# Altium PCB 2026.08.07.HMS.PD.BHHH.PcbDoc (part 2 of 2)
Units mm, origin at the board's own origin, x right, y up, seen from the top; angles counter-clockwise.
Board outline 110 x 110 mm, 2 copper layers (Top Layer, Bottom Layer); 168 components, 117 nets, 606 pads, 1355 vias.
Unrouted connection lines stored in the file: 4.
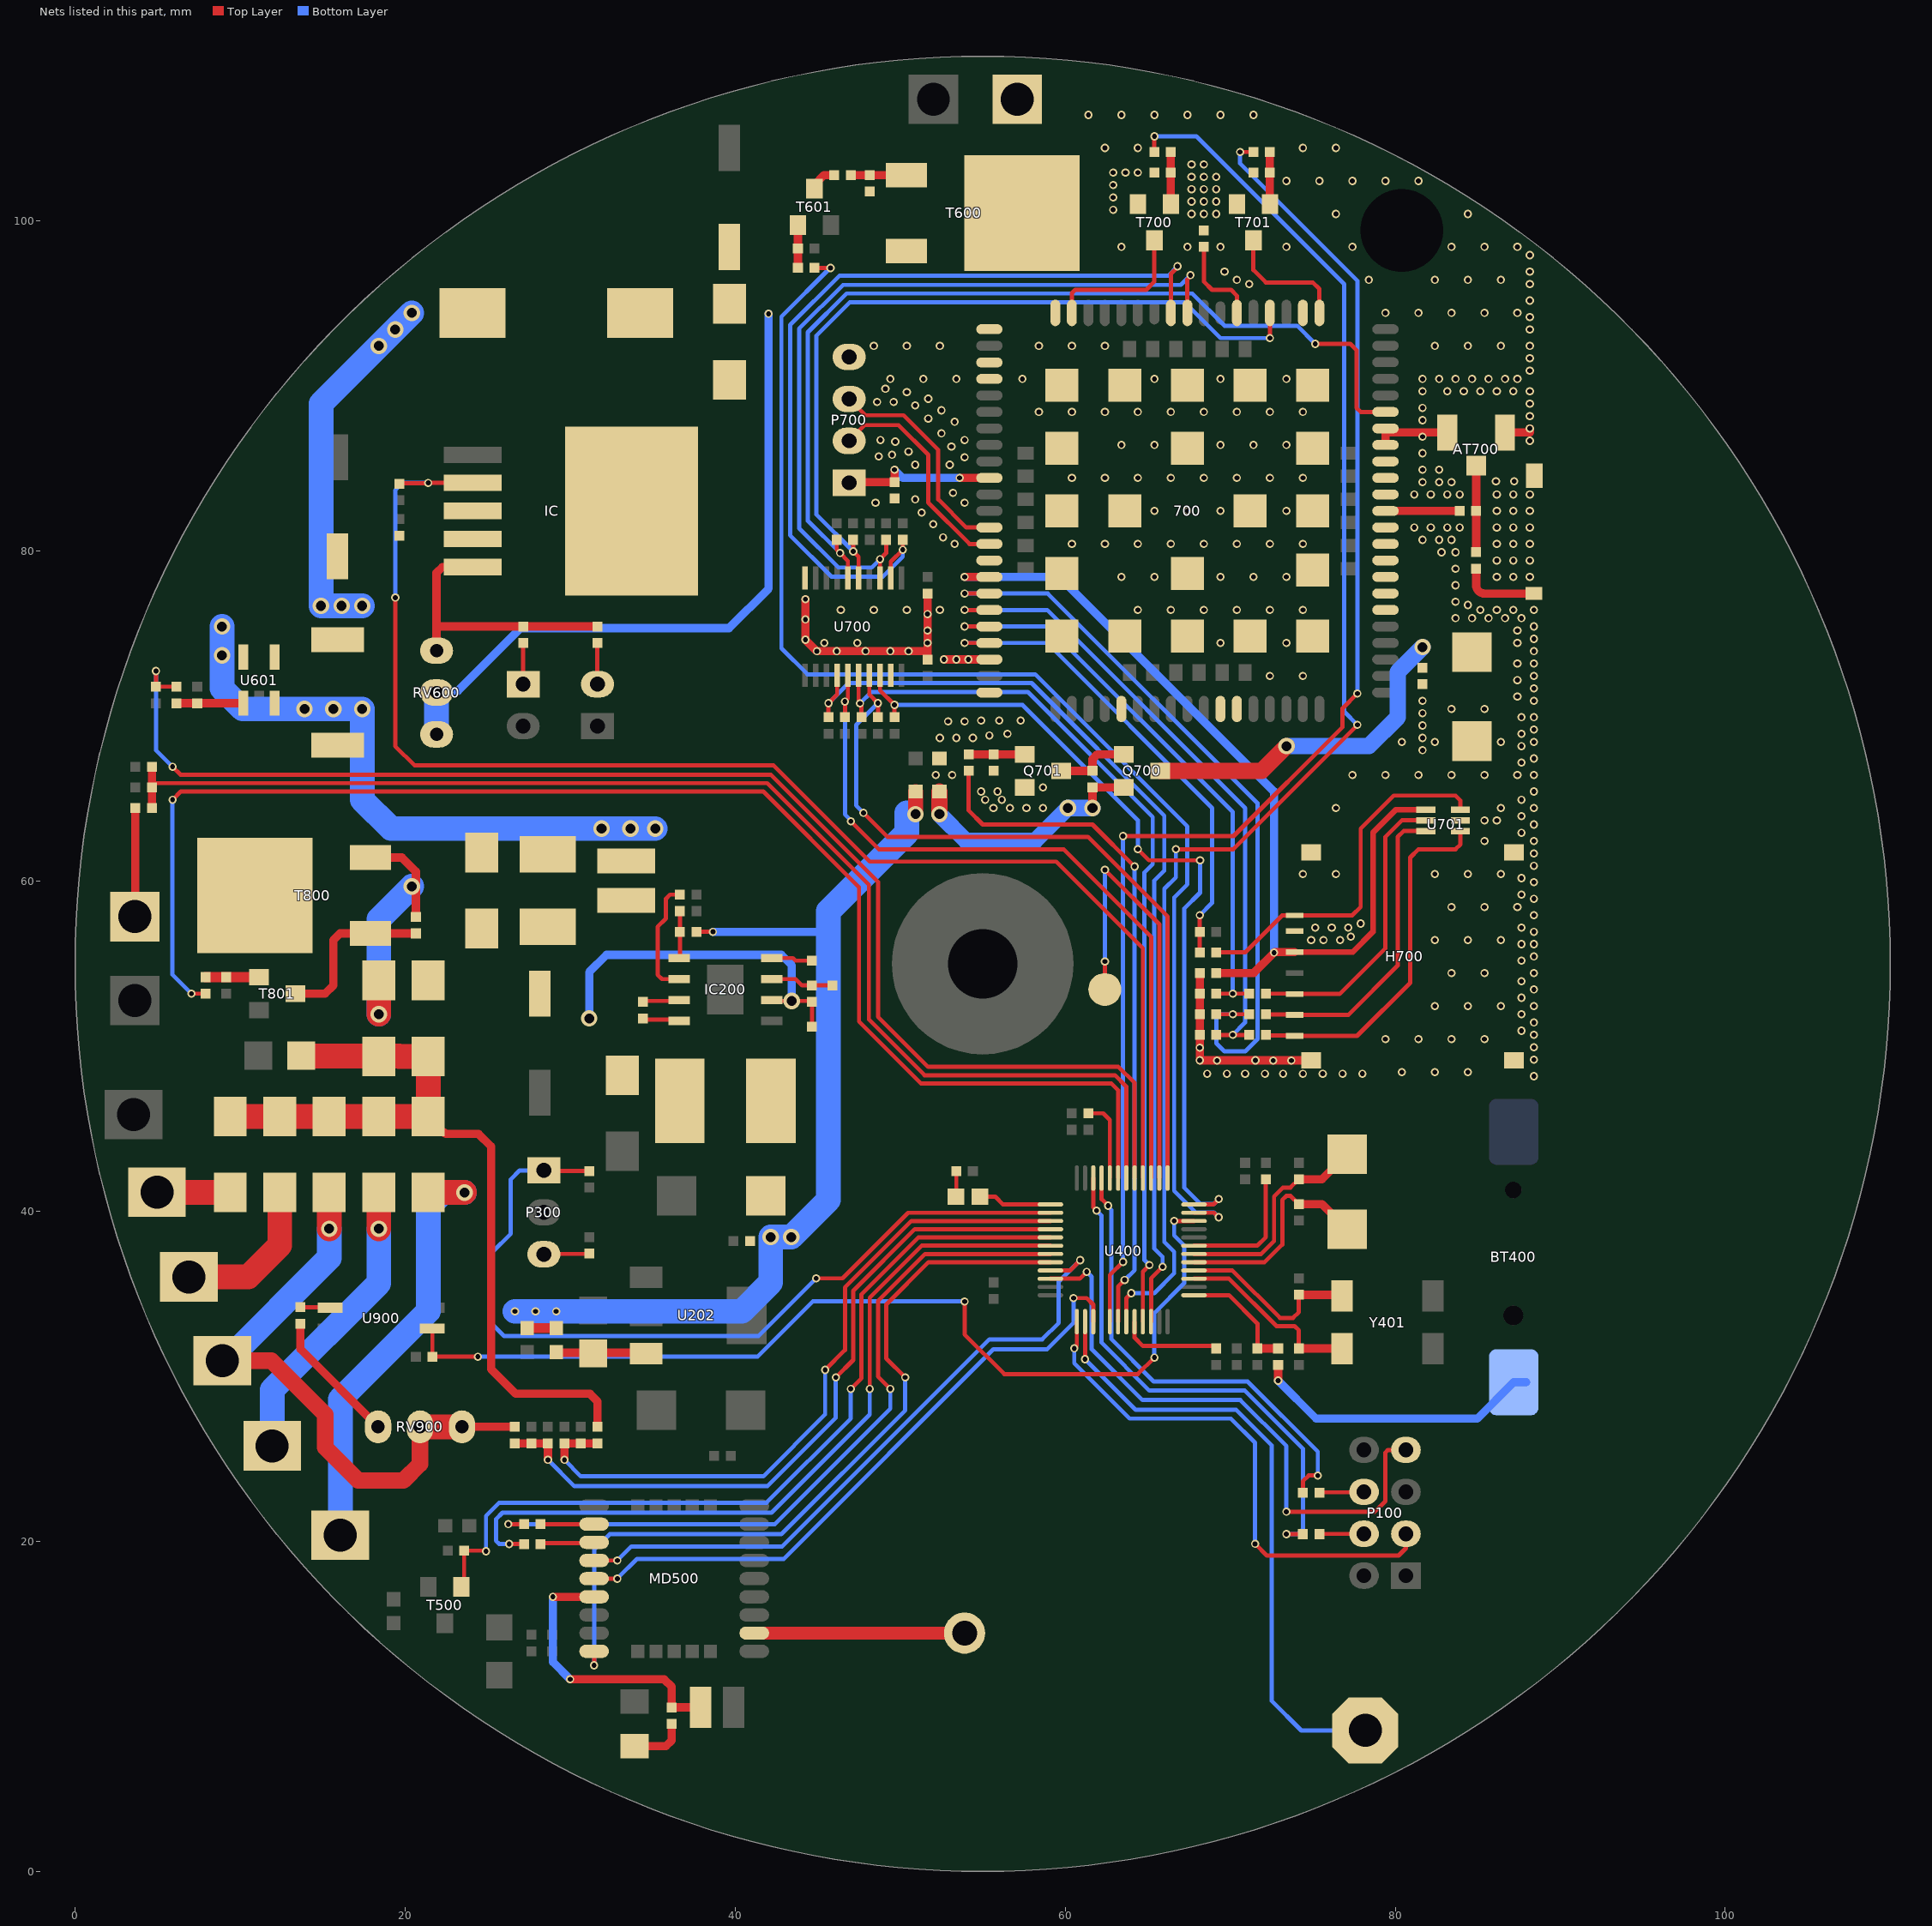
[diagram p2: the nets of this part, all layers, seen from the top]

## Via types
v1: diameter 0.5, hole 0.3, Top Layer to Bottom Layer, tented both sides, 1270 vias
v2: diameter 0.6, hole 0.3, Top Layer to Bottom Layer, tented both sides, 48 vias
v3: diameter 1, hole 0.6, Top Layer to Bottom Layer, tented both sides, 37 vias

## Nets (pads, with @x,y where several pads share a name; then routed paths per layer and width w, separated by ;. In a path a pad name is that pad's centre, name@x,y a point inside that pad or via, vN(x,y) a via of type N, cw(c..) or ccw(c..) an arc to the next point about the centre after c; other vN are vias at no path point) (continued)
GSM.GND: 700.2 700.17 700.18 700.29 700.39 700.45 700.46 700.54 700.58 700.59 700.61 700.62 700.63 700.64 700.65 700.69 700.70 700.71 700.72 700.73 700.74 700.75 700.76 700.77 700.78 700.79 700.80 700.81 700.82 700.83 700.84 700.85 700.86 700.87 700.88 700.89 700.91 700.92 700.94 AT700.2 AT701.2 C701.2 C703.1 C704.1 C705.1 C706.1 C707.1 C708.1 C709.1 C730.2 H700.5 L701.2 P700.4 Q701.2 R700.1 R707.1 R709.2 R711.2 T700.2 T701.2 U700.10 U700.19 U701.2 | length 35.2
  Top Layer w0.5: v1(44.254,77.093) v1(44.254,74.643) v1(44.954,73.943) v1(49.404,73.943) 51.604,73.943 51.654,73.993 ; C705.1@51.654,73.443 51.654,73.993 ; C704.1@51.654,77.443 51.654,73.993 ; v1(52.654,73.443) 700.92@55.404,73.443 ; C706.1@68.154,54.443 C707.1@68.154,53.193 C709.1@68.154,51.943 C708.1@68.154,50.693 v1(68.154,49.153) H700.5@74.904,49.153 ; 700.64@79.404,86.443 79.404,87.193 AT700.2@83.154,87.193 ; AT700.2@86.654,87.193 88.154,87.193 v1(88.154,87.443)
  other v1: 88.404,48.193 68.604,48.343 69.804,48.343 70.904,48.343 72.104,48.343 73.204,48.343 74.404,48.343 75.604,48.343 76.804,48.343 78.004,48.343 80.404,48.443 82.404,48.443 84.404,48.443 69.204,49.143 72.604,49.143 73.704,49.143 71.529,49.153 88.404,49.193 68.154,49.923 88.404,49.943 79.404,50.443 81.404,50.443 83.404,50.443 85.404,50.443 88.404,50.693 87.654,50.943 88.404,51.443 87.654,51.943 82.404,52.443 84.404,52.443 86.404,52.443 88.404,52.443 87.654,52.943 88.404,53.443 87.654,53.943 83.404,54.443 85.404,54.443 88.404,54.443 87.654,55.193 88.404,55.443 87.654,56.193 88.404,56.193 74.904,56.443 75.654,56.443 76.654,56.443 82.404,56.443 84.404,56.443 86.404,56.443 77.304,56.643 88.404,56.943 75.154,57.193 76.154,57.193 77.154,57.193 87.654,57.193 77.904,57.443 88.404,57.943 83.404,58.443 85.404,58.443 87.404,58.443 88.404,58.943 87.654,59.193 88.404,59.943 87.654,60.193 74.404,60.443 76.404,60.443 82.404,60.443 84.404,60.443 86.404,60.443 88.404,60.943 88.404,61.693 85.404,62.443 88.404,62.443 87.654,62.943 88.404,63.443 85.404,63.693 86.154,63.693 87.654,63.943 55.654,64.443 56.654,64.443 57.654,64.443 58.654,64.443 76.404,64.443 86.404,64.443 88.404,64.443 55.154,64.943 56.154,64.943 87.654,64.943 54.904,65.443 55.904,65.443 88.404,65.443 58.654,65.693 52.154,66.443 53.154,66.443 77.404,66.443 79.404,66.443 81.404,66.443 83.404,66.443 85.404,66.443 87.404,66.443 88.404,66.443 87.654,67.193 88.404,67.443 81.654,67.943 87.654,68.193 80.404,68.443 82.404,68.443 86.404,68.443 88.404,68.443 52.404,68.693 53.404,68.693 54.404,68.693 81.654,68.693 55.404,68.843 56.504,68.943 87.654,68.943 88.404,69.193 81.654,69.443 52.904,69.693 53.904,69.693 54.904,69.743 56.004,69.743 57.304,69.743 87.654,69.943 88.404,69.943 81.654,70.193 83.404,70.443 85.404,70.443 81.654,70.943 88.404,70.943 87.404,71.193 88.404,71.693 87.404,72.193 72.404,72.443 74.404,72.443 88.404,72.443 87.404,73.193 88.404,73.193 53.404,73.443 54.129,73.443 46.154,73.943 47.904,73.943 50.504,73.943 88.404,73.943 45.404,74.443 47.404,74.443 51.654,74.443 69.404,74.443 73.404,74.443 87.404,74.443 88.404,74.693 51.654,75.193 87.404,75.193 88.404,75.443 44.254,75.868 83.654,75.943 84.654,75.943 85.654,75.943 86.654,75.943 87.654,75.943 51.654,76.193 46.404,76.443 48.404,76.443 50.404,76.443 52.404,76.443 64.404,76.443 66.404,76.443 68.404,76.443 70.404,76.443 72.404,76.443 74.404,76.443 85.154,76.443 86.154,76.443 87.154,76.443 88.404,76.443 84.404,76.743 83.654,76.943 83.654,77.943 63.404,78.443 65.404,78.443 69.404,78.443 71.404,78.443 73.404,78.443 86.154,78.443 87.154,78.443 88.154,78.443 83.654,78.943 86.154,79.443 87.154,79.443 88.154,79.443 82.804,79.943 83.654,79.943 53.304,80.443 60.404,80.443 62.404,80.443 64.404,80.443 66.404,80.443 68.404,80.443 70.404,80.443 72.404,80.443 74.404,80.443 86.154,80.443 87.154,80.443 88.154,80.443 81.654,80.693 82.654,80.693 83.404,80.693 52.604,80.843 81.154,81.443 82.154,81.443 83.154,81.443 83.904,81.443 86.154,81.443 87.154,81.443 88.154,81.443 52.004,81.643 51.304,82.343 65.404,82.443 67.404,82.443 69.404,82.443 73.404,82.443 86.154,82.443 87.154,82.443 88.154,82.443 48.504,82.943 53.904,82.943 50.904,83.143 81.154,83.443 82.154,83.443 83.154,83.443 83.904,83.443 86.154,83.443 87.154,83.443 88.154,83.443 53.204,83.543 81.654,84.193 82.654,84.193 83.404,84.193 86.104,84.243 87.204,84.243 60.404,84.443 62.404,84.443 64.404,84.443 66.404,84.443 68.404,84.443 70.404,84.443 72.404,84.443 74.404,84.443 81.654,84.943 82.654,84.943 50.904,85.243 53.004,85.243 53.904,85.693 48.704,85.743 49.504,85.843 81.654,85.943 50.504,86.043 53.104,86.343 63.404,86.443 65.404,86.443 69.404,86.443 71.404,86.443 73.404,86.443 49.704,86.643 88.154,86.693 48.804,86.743 53.904,86.743 81.654,86.943 52.504,87.143 53.304,87.843 81.654,87.943 51.704,88.043 88.154,88.193 58.404,88.443 60.404,88.443 62.404,88.443 64.404,88.443 66.404,88.443 68.404,88.443 70.404,88.443 72.404,88.443 74.404,88.443 52.504,88.543 81.654,88.693 50.904,88.843 88.154,88.943 48.604,89.043 49.604,89.043 51.704,89.243 50.404,89.643 81.654,89.693 83.154,89.693 84.154,89.693 85.154,89.693 86.154,89.693 87.154,89.693 88.154,89.693 49.104,89.843 49.404,90.443 51.404,90.443 53.404,90.443 57.404,90.443 65.404,90.443 69.404,90.443 73.404,90.443 81.654,90.443 82.654,90.443 83.654,90.443 84.654,90.443 85.654,90.443 86.654,90.443 87.404,90.443 88.154,90.943 88.154,91.693 48.404,92.443 50.404,92.443 52.404,92.443 58.404,92.443 60.404,92.443 62.404,92.443 82.404,92.443 84.404,92.443 86.404,92.443 88.154,92.443 88.154,93.443 88.154,94.193 79.404,94.443 81.404,94.443 83.404,94.443 85.404,94.443 87.404,94.443 88.154,95.193 71.154,96.193 88.154,96.193 70.404,96.443 78.404,96.443 82.404,96.443 84.404,96.443 86.404,96.443 69.654,96.943 88.154,96.943 88.154,97.943 63.404,98.443 67.404,98.443 69.404,98.443 73.404,98.443 77.404,98.443 83.404,98.443 85.404,98.443 87.404,98.443 67.654,100.443 68.404,100.443 69.154,100.443 76.404,100.443 84.404,100.443 62.904,100.693 67.654,101.193 68.404,101.193 69.154,101.193 62.904,101.443 67.654,101.943 68.404,101.943 69.154,101.943 62.904,102.193 73.404,102.443 75.404,102.443 77.404,102.443 79.404,102.443 81.404,102.443 67.654,102.693 68.404,102.693 69.154,102.693 62.904,102.943 63.654,102.943 64.404,102.943 67.654,103.443 68.404,103.443 62.404,104.443 64.404,104.443 74.404,104.443 76.404,104.443 61.404,106.443 63.404,106.443 65.404,106.443 67.404,106.443 69.404,106.443 71.404,106.443
GSM.PWR: L700.2 Q700.2 R705.2 | length 15.3
  Top Layer w0.5: v3(61.654,64.443) 61.654,65.693 Q700.2@63.554,65.693
  Top Layer w1: v3(52.377,64.07) L700.2@52.377,65.443
  Bottom Layer w1: v3(52.377,64.07) 54.004,62.443 58.154,62.443 v3(60.154,64.443) v3(61.654,64.443)
GSM.PWRKEY: 700.1 T701.3 | length 7.7
  Top Layer w0.254: T701.3@71.404,98.843 71.404,97.043 72.154,96.293 75.004,96.293 75.404,95.893 700.1@75.404,94.443
GSM.RESET: 700.16 T700.3 | length 9
  Top Layer w0.254: 700.16@60.404,94.443 60.404,95.643 60.604,95.843 64.904,95.843 65.404,96.343 T700.3@65.404,98.843
GSM.RI: 700.4 R717.1 U700.5 | length 47.2
  Top Layer w0.254: R717.1@47.154,80.693 v1(47.154,79.993) 47.479,79.668 U700.5@47.479,78.393 ; v1(72.404,92.918) 700.4@72.404,94.443
  Bottom Layer w0.254: v1(47.154,79.993) 44.929,82.218 44.929,93.071 46.951,95.093 67.232,95.093 69.407,92.918 v1(72.404,92.918)
GSM.Status: 700.66 R718.1 U700.6 | length 57.8
  Top Layer w0.254: R718.1@46.154,80.693 46.154,80.093 v1(46.354,79.893) 46.829,79.418 U700.6@46.829,78.393 ; v1(75.154,92.568) 77.279,92.568 77.654,92.193 77.654,88.693 77.904,88.443 700.66@79.404,88.443
  Bottom Layer w0.254: v1(46.354,79.893) 44.404,81.843 44.404,93.268 46.754,95.618 67.704,95.618 69.654,93.668 74.054,93.668 v1(75.154,92.568)
GSM.VBAT: 700.55 700.56 700.57 C703.2 C730.1 Q700.3 | length 20.6
  Top Layer w1: Q700.3@65.754,66.693 71.904,66.693 v3(73.404,68.193)
  Bottom Layer w1: v3(73.404,68.193) 78.404,68.193 80.154,69.943 80.154,72.693 v3(81.654,74.193)
LED: D400.2 U400.25 | length 4.5
  Top Layer w0.254: D400.2@54.829,40.893 55.754,40.893 56.229,40.418 U400.25@59.104,40.418
LED_PWR: C600.1 D600.2 R602.2 RV600.2 RV600.3 T600.3 | length 41.9
  Bottom Layer w0.5: RV600.2@21.904,71.443 22,71.539 23.2,71.539 27.004,75.343 39.629,75.343 42.029,77.743 v1(42.029,94.393)
  Bottom Layer w1.5: RV600.3@21.904,68.903 RV600.2@21.904,71.443
LED_VCC: C601.2 C602.1 IC.4 L601.1 R603.2 U601.4 | length 22.5
  Bottom Layer w1.5: v3(17.404,76.693) v3(16.154,76.693) v3(14.904,76.693) 14.904,88.943 v3(20.404,94.443)
  other v3: 18.404,92.443 19.404,93.443
Net700_60: 700.60 C700.2 | length 4.5
  Top Layer w0.5: 700.60@79.404,82.443 C700.2@83.904,82.443
Net`_2: `.2 P300.3 | length 2.8
  Top Layer w0.254: P300.3@28.404,37.403 28.424,37.423 31.134,37.423 `.2@31.154,37.443
NetAT500_1: AT500.1 MD500.11 | length 12.8
  Top Layer w0.8: MD500.11@41.154,14.443 AT500.1@53.904,14.443
NetAT700_1: AT700.1 C700.1 R777.2 | length 8
  Top Layer w0.35: C700.1@84.904,82.443 AT700.1@84.904,85.193
  Top Layer w0.5: R777.2@84.904,79.943 C700.1@84.904,82.443 AT700.1@84.904,85.193
NetAT701_1: AT701.1 R777.1 | length 4.8
  Top Layer w0.5: R777.1@84.904,78.943 84.904,77.943 ccw(c85.404,77.943) 85.404,77.443 AT701.1@88.404,77.443
NetC200_1: C200.1 D200.2 IC200.8 L201.1 | length 2.3
  Top Layer w0.254: C200.1@34.404,51.693 34.481,51.616 36.523,51.616 IC200.8@36.6,51.538
NetC200_2: C200.2 IC200.7 | length 2.2
  Top Layer w0.254: C200.2@34.404,52.693 34.461,52.751 36.543,52.751 IC200.7@36.6,52.808
NetC201_2: C201.2 L202.2 U202.3 | length 5.5
  Top Layer w0.5: L202.2@29.154,31.47 29.193,31.432 34.567,31.432 U202.3@34.606,31.393
NetC204_1: C204.1 C205.2 IC200.2 L200.2 R200.2 | length 21.9
  Top Layer w0.254: IC200.2@42.207,52.808 42.265,52.75 v3(43.431,52.75) 44.596,52.75 R200.2@44.654,52.693 C205.2@44.654,51.193
  Bottom Layer w0.5: v3(31.154,51.693) 31.154,54.493 32.204,55.543 42.804,55.543 43.431,54.916 v3(43.431,52.75)
NetC503_1: C503.1 MD500.6 R502.1 | length 17.3
  Top Layer w0.5: v1(28.954,16.643) MD500.6@31.454,16.643 ; v1(30.004,11.643) 35.704,11.643 36.154,11.193 R502.1@36.154,9.943 C503.1@37.904,9.943
  Bottom Layer w0.5: v1(28.954,16.643) 28.954,12.693 v1(30.004,11.643)
NetC603_2: C603.2 R606.2 U400.17 | length 85.2
  Top Layer w0.254: v1(4.904,72.743) C603.2@4.904,71.793 R606.2@6.154,71.793 ; v1(5.904,66.943) 6.388,66.459 6.804,66.459 41.888,66.459 42.163,66.459 48.654,59.968 48.654,51.793 51.688,48.759 63.225,48.759 64.204,47.78 U400.17@64.204,42.018
  Bottom Layer w0.254: v1(4.904,72.743) 4.904,67.943 v1(5.904,66.943)
NetC801_2: C801.2 R800.1 R803.2 U400.27 | length 43.1
  Top Layer w0.254: v1(45.456,30.395) 46.654,31.593 46.654,35.386 50.686,39.418 U400.27@59.104,39.418
  Top Layer w0.5: v1(29.654,24.943) R803.2@29.654,25.943 R800.1@31.654,25.943
  Bottom Layer w0.254: v1(29.654,24.943) 30.654,23.943 41.704,23.943 45.456,27.695 v1(45.456,30.395)
NetC803_2: C803.2 R802.1 R804.2 U400.18 | length 79.5
  Top Layer w0.254: R804.2@4.654,65.951 41.396,65.951 41.946,65.951 48.104,59.793 48.104,51.625 51.478,48.251 63.014,48.251 63.704,47.561 U400.18@63.704,42.018
  Top Layer w0.5: R802.1@4.654,64.443 4.654,64.943 4.654,65.951 C803.2@4.654,66.943
NetC900_2: C900.2 R900.1 R901.2 U400.28 | length 44.5
  Top Layer w0.254: v1(46.1,29.939) 47.154,30.993 47.154,35.179 50.893,38.918 U400.28@59.104,38.918
  Top Layer w0.5: R900.1@26.654,25.943 R901.2@28.654,25.943 v1(28.654,24.943)
  Bottom Layer w0.254: v1(28.654,24.943) 30.254,23.343 41.953,23.343 46.1,27.491 v1(46.1,29.939)
NetD400_1: D400.1 R404.2 | length 1.6
  Top Layer w0.254: D400.1@53.379,40.893 53.404,40.918 R404.2@53.404,42.443
NetD500_2: D500.2 R502.2 | length 3.4
  Top Layer w0.5: D500.2@33.904,7.593 35.804,7.593 36.154,7.943 R502.2@36.154,8.943
NetD600_1: D600.1 IC.3 IC.6 L601.2
NetD800_2: D800.2 R801.2 T800.3 | length 16.5
  Top Layer w0.5: T800.3@17.904,61.443 19.804,61.443 20.654,60.593 R801.2@20.654,57.843
  Top Layer w1.5: v3(18.404,51.943) D800.2@18.404,53.993
  Bottom Layer w1.5: v3(18.404,51.943) 18.404,57.693 v3(20.404,59.693)
NetD900_1: D900.1 T900.1 | length 4.4
  Top Layer w1.5: T900.1@4.962,41.157 4.969,41.15 9.397,41.15 D900.1@9.404,41.143
NetD902_1: D902.1 T901.1 | length 9.5
  Top Layer w1.5: T901.1@6.892,36.026 10.487,36.026 12.404,37.943 D902.1@12.404,41.143
NetD905_1: D905.1 T903.1 | length 18
  Top Layer w1.5: v3(18.404,38.943) D905.1@18.404,41.143
  Bottom Layer w1.5: T903.1@11.947,25.79 11.947,29.186 18.404,35.643 v3(18.404,38.943)
NetD906_1: D906.1 T904.1 | length 26.9
  Top Layer w1.5: D906.1@21.404,41.143 v3(23.604,41.143)
  Bottom Layer w1.5: T904.1@16.074,20.38 16.074,28.613 21.404,33.943 21.404,40.264 22.283,41.143 v3(23.604,41.143)
NetH700_2: H700.2 R712.2 U701.5 | length 18
  Top Layer w0.254: R712.2@72.154,53.193 73.884,53.193 H700.2@73.904,53.173 76.634,53.173 79.404,55.943 79.404,62.693 80.404,63.693 U701.5@81.854,63.693
NetH700_3: H700.3 R713.2 U701.1 | length 21.9
  Top Layer w0.254: R713.2@72.154,50.693 72.184,50.663 73.874,50.663 H700.3@73.904,50.633 77.686,50.633 80.904,53.851 80.904,61.443 81.404,61.943 83.654,61.943 83.954,62.243 U701.1@83.954,63.043
NetH700_7: H700.7 R715.2 U701.6 | length 18.9
  Top Layer w0.254: R715.2@72.154,51.943 72.174,51.923 73.884,51.923 H700.7@73.904,51.903 77.16,51.903 80.154,54.897 80.154,62.693 80.504,63.043 U701.6@81.854,63.043
NetH700_8: H700.8 R714.2 U701.3 | length 22.2
  Top Layer w0.254: R714.2@69.154,55.693 70.904,55.693 73.144,57.933 H700.8@73.904,57.933 77.394,57.933 77.904,58.443 77.904,63.193 79.904,65.193 83.654,65.193 83.954,64.893 U701.3@83.954,64.343
NetIC200_3: IC200.3 R200.1 R201.2 | length 3.9
  Top Layer w0.254: IC200.3@42.207,54.078 43.669,54.078 44.054,53.693 R201.2@45.904,53.693
NetIC200_4: IC200.4 R204.2 | length 2.5
  Top Layer w0.254: IC200.4@42.207,55.348 43.499,55.348 43.654,55.193 R204.2@44.654,55.193
NetIC200_5: IC200.5 R202.1 R203.2 | length 2.9
  Top Layer w0.254: IC200.5@36.6,55.348 36.654,55.401 R203.2@36.654,58.193
NetIC200_6: IC200.6 R205.2 | length 7.2
  Top Layer w0.254: IC200.6@36.543,54.135 IC200.6@36.6,54.078 35.569,54.078 35.304,54.343 35.304,57.243 35.804,57.743 35.804,58.943 36.054,59.193 R205.2@36.654,59.193
NetIC_2: IC.2 R620.2 U400.16 | length 86.4
  Top Layer w0.254: v1(19.404,77.193) 19.404,68.193 20.579,67.018 42.329,67.018 48.154,61.193 59.454,61.193 64.704,55.943 U400.16@64.704,42.018 ; R620.2@19.654,84.093 19.679,84.118 21.379,84.118 v1(21.404,84.143) IC.2@24.089,84.143
  Bottom Layer w0.254: v1(19.404,77.193) 19.404,83.693 19.854,84.143 v1(21.404,84.143)
NetIC_5: IC.5 R600.2 R601.2 RV600.1 | length 17.1
  Top Layer w0.5: RV600.1@21.904,73.983 21.904,75.443 ; IC.5@23.839,78.793 IC.5@24.089,79.043 22.254,79.043 21.904,78.693 21.904,75.443 ; R600.2@31.654,75.443 21.904,75.443
NetMD500_2: MD500.2 R500.1 | length 3.3
  Top Layer w0.254: R500.1@28.204,21.043 MD500.2@31.454,21.043
NetMD500_3: MD500.3 R501.1 | length 3.3
  Top Layer w0.254: R501.1@28.204,19.843 28.254,19.893 31.404,19.893 MD500.3@31.454,19.943
NetMD500_4: MD500.4 U400.33 | length 40.5
  Top Layer w0.254: MD500.4@31.454,18.843 v1(32.861,18.843) ; U400.33@59.104,36.418 60.279,36.418 v1(60.904,37.043)
  Bottom Layer w0.254: v1(32.861,18.843) 33.711,19.693 42.854,19.693 55.404,32.243 58.604,32.243 59.604,33.243 59.604,35.743 v1(60.904,37.043)
NetMD500_5: MD500.5 U400.39 | length 39.4
  Top Layer w0.254: MD500.5@31.454,17.743 v1(32.861,17.743) ; v1(60.504,34.743) 61.304,34.743 61.704,34.343 U400.39@61.704,33.318
  Bottom Layer w0.254: v1(32.861,17.743) 34.061,18.943 42.953,18.943 55.653,31.643 58.904,31.643 60.504,33.243 v1(60.504,34.743)
NetMD500_9: MD500.9 U400.32 | length 48.2
  Top Layer w0.254: v1(31.454,12.493) MD500.9@31.454,13.343 ; v1(50.304,29.939) 49.154,31.089 49.154,34.35 51.722,36.918 U400.32@59.104,36.918
  Bottom Layer w0.254: v1@31.454,12.393 v1(31.454,12.493) 31.454,19.493 32.404,20.443 42.804,20.443 50.304,27.943 v1(50.304,29.939)
NetP100_3: P100.3 U400.37 | length 32.2
  Top Layer w0.254: v1(60.55,31.697) 60.704,31.85 U400.37@60.704,33.318 ; v1(71.504,19.851) 72.212,19.143 80.204,19.143 80.644,19.583 P100.3@80.644,20.463
  Bottom Layer w0.254: v1(60.55,31.697) 60.55,30.797 63.904,27.443 70.039,27.443 71.504,25.978 v1(71.504,19.851)
NetP100_4: P100.4 R102.1 | length 2.7
  Top Layer w0.254: R102.1@75.404,20.443 75.414,20.453 78.094,20.453 P100.4@78.104,20.463
NetP100_6: P100.6 R100.1 | length 2.7
  Top Layer w0.254: R100.1@75.404,22.943 75.434,22.973 78.074,22.973 P100.6@78.104,23.003
NetP100_7: P100.7 U400.34 | length 35.9
  Top Layer w0.254: U400.34@59.104,35.918 60.879,35.918 v1(61.3,36.339) ; v1(73.404,21.797) 78.758,21.797 79.404,22.443 79.404,25.394 79.553,25.543 P100.7@80.644,25.543
  Bottom Layer w0.254: v1(61.3,36.339) 61.604,36.034 61.604,31.643 64.679,28.568 70.612,28.568 73.404,25.776 v1(73.404,21.797)
NetP300_1: P300.1 R300.1 U400.26 | length 51.4
  Top Layer w0.254: P300.1@28.404,42.483 28.444,42.443 R300.1@31.154,42.443 ; v1(44.904,35.943) 46.504,35.943 50.479,39.918 U400.26@59.104,39.918
  Bottom Layer w0.254: P300.1@28.404,42.483 26.944,42.483 26.404,41.943 26.404,38.643 25.304,37.543 25.304,33.143 26.004,32.443 41.404,32.443 v1(44.904,35.943)
NetP600_1: P600.1 T600.2
NetP601_2: P601.2 R600.1 | length 2.5
  Top Layer w0.254: P601.2@31.654,71.943 R600.1@31.654,74.443
NetP602_1: P602.1 R601.1 | length 2.5
  Top Layer w0.254: P602.1@27.154,71.943 R601.1@27.154,74.443
NetQ700_1: Q700.1@63.554,67.693 Q701.3 R705.1 | length 4.6
  Top Layer w0.5: Q701.3@59.754,66.693 61.654,66.693 61.654,67.4 61.947,67.693 Q700.1@63.554,67.693
NetQ701_1: Q701.1@57.554,67.693 R706.1 R707.2 | length 3.4
  Top Layer w0.5: R706.1@54.154,67.693 55.654,67.693 Q701.1@57.554,67.693
NetR100_2: R100.2 U400.21 | length 28.5
  Top Layer w0.254: U400.21@62.204,42.018 62.204,40.743 v1(62.604,40.343) ; R100.2@74.404,22.943 74.404,23.643 74.754,23.993 v1(75.304,23.993)
  Bottom Layer w0.254: v1(62.604,40.343) 62.604,40.276 62.804,40.076 62.804,32.252 65.363,29.693 71.054,29.693 75.304,25.443 v1(75.304,23.993)
NetR102_2: R102.2 U400.22 | length 32
  Top Layer w0.254: U400.22@61.704,42.018 61.704,40.243 v1(61.904,40.043) ; v1(73.404,20.443) R102.2@74.404,20.443
  Bottom Layer w0.254: v1(61.904,40.043) 62.204,39.743 62.204,32.043 65.104,29.143 70.886,29.143 74.404,25.625 74.404,20.743 74.104,20.443 v1(73.404,20.443)
NetR400_2: R400.2 U400.44 | length 6.1
  Top Layer w0.254: U400.44@64.204,33.318 64.204,32.343 64.704,31.843 R400.2@69.154,31.843
NetR401_1: R401.1 U400.7 | length 8.1
  Top Layer w0.254: U400.7@67.804,37.918 71.629,37.918 72.154,38.443 R401.1@72.154,41.943
NetR402_2: R402.2 R403.2 U400.1 | length 7.3
  Top Layer w0.254: U400.1@67.804,34.918 69.929,34.918 71.654,33.193 R403.2@71.654,31.693
  Top Layer w0.5: R403.2@71.654,31.693 R402.2@72.904,31.693
NetR405_2: R405.2 U400.20 | length 5
  Top Layer w0.254: R405.2@61.404,45.943 62.304,45.943 62.704,45.543 U400.20@62.704,42.018
NetR500_2: R500.2 U400.31 | length 45.5
  Top Layer w0.254: v1(26.254,21.043) R500.2@27.204,21.043 ; v1(49.404,29.243) 48.654,29.993 48.654,34.557 51.515,37.418 U400.31@59.104,37.418
  Bottom Layer w0.254: v1(26.254,21.043) 42.404,21.043 49.404,28.043 v1(49.404,29.243)
NetR501_2: R501.2 U400.30 | length 47.7
  Top Layer w0.254: v1(26.304,19.843) R501.2@27.204,19.843 ; v1(48.154,29.243) 48.154,34.765 51.307,37.918 U400.30@59.104,37.918
  Bottom Layer w0.254: v1(26.304,19.843) 25.704,19.843 25.504,20.043 25.504,21.343 25.904,21.743 42.204,21.743 48.154,27.693 v1(48.154,29.243)
NetR503_1: R503.1 T500.1@23.404,17.243 U400.29 | length 51
  Top Layer w0.254: T500.1@23.404,17.243 23.579,17.418 R503.1@23.579,19.443 v1@24.904,19.443 ; v1(47.004,29.243) 47.654,29.893 47.654,34.972 51.1,38.418 U400.29@59.104,38.418
  Bottom Layer w0.254: v1(24.904,19.405) 24.904,21.543 25.704,22.343 41.904,22.343 47.004,27.443 v1(47.004,29.243)
NetR602_1: R602.1 R608.1 T600.1 | length 3.4
  Top Layer w0.5: R608.1@47.004,102.793 R602.1@48.154,102.793 T600.1@50.372,102.793
NetR604_1: R604.1 U400.11 | length 81.7
  Top Layer w0.254: R604.1@44.804,97.168 v1(45.779,97.168) ; U400.11@67.804,39.918 69.029,39.918 v1(69.304,39.643)
  Bottom Layer w0.254: v1(45.779,97.168) 45.754,97.168 42.804,94.218 42.804,74.118 44.379,72.543 58.179,72.543 67.404,63.318 67.404,59.818 66.604,59.018 66.604,41.243 67.904,39.943 69.004,39.943 v1(69.304,39.643)
NetR604_2: R604.2 R605.2 T601.1@43.804,99.768 | length 2.6
  Top Layer w0.5: R604.2@43.804,97.168 R605.2@43.804,98.343 T601.1@43.804,99.768
NetR606_1: R606.1 R607.2 U601.1 | length 4
  Top Layer w0.5: R606.1@6.154,70.793 R607.2@7.404,70.793 U601.1@10.204,70.793
NetR608_2: R608.2 T601.3 | length 1.7
  Top Layer w0.5: T601.3@44.804,101.968 44.804,102.218 45.379,102.793 R608.2@46.004,102.793
NetR703_1: R703.1 U400.12 U700.18 | length 50.9
  Top Layer w0.254: U700.18@48.779,72.493 48.779,71.568 v1(49.654,70.693) R703.1@49.654,69.943 ; v1(64.404,61.943) 65.074,61.273 v1(68.174,61.273) ; U400.12@67.804,40.418 68.979,40.418 v1(69.304,40.743)
  Bottom Layer w0.254: v1(49.654,70.693) 57.413,70.693 64.404,63.702 v1(64.404,61.943) ; v1(68.174,61.273) 68.174,59.313 67.204,58.343 67.204,41.443 68.204,40.443 69.004,40.443 v1(69.304,40.743)
NetR704_1: R704.1 U400.13 U700.17 | length 47
  Top Layer w0.254: v1(47.773,64.149) 49.229,62.693 61.379,62.693 66.204,57.868 U400.13@66.204,42.018 ; U700.17@48.129,72.493 48.129,71.318 v1(48.654,70.793) R704.1@48.654,69.943
  Bottom Layer w0.254: v1(47.773,64.149) 47.773,64.152 47.329,64.597 47.329,69.468 v1(48.654,70.793)
NetR706_2: R706.2 U400.42 | length 41.8
  Top Layer w0.254: R706.2@54.154,66.693 54.154,64.293 55.004,63.443 61.654,63.443 v1(64.204,60.893) ; U400.42@63.204,33.318 63.204,35.443 v1(63.604,35.843)
  Bottom Layer w0.254: v1(63.604,35.843) 64.204,36.443 v1(64.204,60.893)
NetR708_1: R708.1 R709.1 T700.1@66.404,101.043 | length 3.1
  Top Layer w0.5: T700.1@66.404,101.043 R709.1@66.404,102.943 R708.1@66.404,104.193
NetR708_2: R708.2 U400.43 | length 88.5
  Top Layer w0.254: U400.43@63.704,33.318 63.704,34.743 v1(64.004,35.043) ; R708.2@65.404,104.193 v1(65.404,105.143) ; v1(66.704,61.943) 70.182,61.943 77.704,69.465 v1(77.704,69.482)
  Bottom Layer w0.254: v1(64.004,35.043) 65.404,35.043 66.604,36.243 66.604,37.543 66.004,38.143 66.004,59.543 66.704,60.243 v1(66.704,61.943) ; v1(65.404,105.143) 67.954,105.143 76.904,96.193 76.904,70.282 v1(77.704,69.482)
NetR710_1: R710.1 R711.1 T701.1@72.404,101.043 | length 3.1
  Top Layer w0.5: T701.1@72.404,101.043 R710.1@72.404,104.193
NetR710_2: R710.2 U400.41 | length 84.8
  Top Layer w0.254: U400.41@62.704,33.318 62.704,36.143 v1(63.504,36.943) ; v1(63.504,62.743) 70.204,62.743 76.804,69.343 76.804,70.482 v1(77.704,71.382) ; v1(70.597,104.193) R710.2@71.404,104.193
  Bottom Layer w0.254: v1(63.504,36.943) v1(63.504,62.743) ; v1(70.597,104.193) 70.597,103.5 77.704,96.393 v1(77.704,71.382)
NetR720_1: R720.1 U400.45 U700.16 | length 54.9
  Top Layer w0.254: U700.16@47.479,72.493 47.479,70.868 47.654,70.693 R720.1@47.654,69.943 ; U400.45@64.704,33.318 64.704,36.343 v1(65.104,36.743)
  Bottom Layer w0.254: v1(47.567,70.781) 48.254,71.468 57.734,71.468 65.304,63.898 65.304,61.043 64.804,60.543 64.804,37.043 v1(65.104,36.743)
NetR721_1: R721.1 U400.15 U700.15 | length 45.7
  Top Layer w0.254: R721.1@46.654,69.943 v1(46.654,70.893) 46.829,71.068 U700.15@46.829,72.493 ; v1(47.014,63.633) 48.704,61.943 59.904,61.943 65.204,56.643 U400.15@65.204,42.018
  Bottom Layer w0.254: v1(46.654,70.893) 46.654,64.06 47.014,63.699 v1(47.014,63.633)
NetR722_1: R722.1 U400.46 U700.14 | length 58.4
  Top Layer w0.254: R722.1@45.654,69.943 v1(45.654,70.793) 46.179,71.318 U700.14@46.179,72.493 ; U400.46@65.204,33.318 65.204,35.943 v1(65.904,36.643)
  Bottom Layer w0.254: v1(45.654,70.793) 46.879,72.018 57.962,72.018 66.004,63.976 66.004,60.643 65.404,60.043 65.404,37.743 65.904,37.243 v1(65.904,36.643)
NetR801_1: R801.1 T800.1 T801.3 | length 10.4
  Top Layer w0.5: T801.3@13.354,53.193 15.154,53.193 15.654,53.693 15.654,56.443 16.054,56.843 T800.1@17.904,56.843 R801.1@20.654,56.843
NetR805_1: R805.1 U400.19 | length 88.2
  Top Layer w0.254: v1(5.904,64.943) 6.404,65.443 6.804,65.443 40.904,65.443 41.704,65.443 47.504,59.643 47.504,51.506 51.267,47.743 62.804,47.743 63.204,47.343 U400.19@63.204,42.018 ; v1(7.054,53.193) R805.1@7.904,53.193
  Bottom Layer w0.254: v1(5.904,64.943) 5.904,54.343 v1(7.054,53.193)
NetR805_2: R805.2 R806.2 T801.1@11.154,54.193 | length 3.3
  Top Layer w0.6: R805.2@7.904,54.193 R806.2@9.154,54.193 T801.1@11.154,54.193
NetR902_2: R902.2 U400.10 U900.3 | length 60.6
  Top Layer w0.254: U900.3@21.65,32.891 21.654,32.887 R902.2@21.654,31.193 v1(24.404,31.193) ; v1(53.904,34.543) 53.904,32.543 56.304,30.143 64.404,30.143 v1(65.404,31.143) ; v1(66.604,39.418) U400.10@67.804,39.418
  Bottom Layer w0.254: v1(24.404,31.193) 41.354,31.193 44.704,34.543 v1(53.904,34.543) ; v1@65.404,31.243 65.404,33.843 67.204,35.643 67.204,37.943 66.604,38.543 v1(66.604,39.418)
NetR905_1: R905.1 U900.1 | length 1.8
  Top Layer w0.254: R905.1@13.654,34.193 13.67,34.177 15.434,34.177 U900.1@15.45,34.161
NetR905_2: R905.2 RV900.1 | length 8.2
  Top Layer w0.5: R905.2@13.654,33.193 13.654,31.653 RV900.1@18.364,26.943
NetT300_1: T300.1 U400.38 | length 37.6
  Top Layer w0.254: v1(61.204,31.043) U400.38@61.204,33.318
  Bottom Layer w0.254: v1(61.204,31.043) 64.279,27.968 70.363,27.968 72.504,25.827 72.504,10.343 74.304,8.543 T300.1@78.179,8.543
NetT400_1: T400.1 U400.14 | length 27.3
  Top Layer w0.254: T400.1@62.404,53.443 v1(62.404,55.143) ; v1(62.404,60.693) 65.704,57.393 U400.14@65.704,42.018
  Bottom Layer w0.254: v1(62.404,55.143) v1(62.404,60.693)
OSC32I: C403.2 U400.3 Y401.1 | length 11.4
  Top Layer w0.254: U400.3@67.804,35.918 69.929,35.918 72.804,33.043 73.904,33.043 74.154,32.793 C403.2@74.154,31.693
  Top Layer w0.5: C403.2@74.154,31.693 76.754,31.693 Y401.1@76.779,31.668
OSC32O: C404.2 U400.4 Y401.4 | length 11.4
  Top Layer w0.254: U400.4@67.804,36.418 70.136,36.418 73.011,33.543 73.804,33.543 74.154,33.893 C404.2@74.154,34.943
  Top Layer w0.5: C404.2@74.154,34.943 76.704,34.943 Y401.4@76.779,34.868
OSCI: C401.2 U400.5 Y400.1 | length 13.4
  Top Layer w0.254: U400.5@67.804,36.918 72.086,36.918 73.154,37.986 73.154,40.693 73.404,40.943 73.654,40.943 C401.2@74.154,40.443
  Top Layer w0.5: C401.2@74.154,40.443 75.554,40.443 Y400.1@77.079,38.918
OSCO: C400.2 U400.6 Y400.2 | length 13.4
  Top Layer w0.254: U400.6@67.804,37.418 71.879,37.418 72.654,38.193 72.654,40.9 73.197,41.443 73.654,41.443 C400.2@74.154,41.943
  Top Layer w0.5: C400.2@74.154,41.943 75.554,41.943 Y400.2@77.079,43.468
SIM.CLK: 700.32 C708.2 R713.1 | length 39.5
  Top Layer w0.254: v1(53.904,76.443) 700.32@55.404,76.443 ; C708.2@69.154,50.693 v1(70.154,50.693) R713.1@71.154,50.693
  Bottom Layer w0.254: v1(53.904,76.443) 58.904,76.443 70.904,64.443 70.904,51.443 v1(70.154,50.693)
SIM.DATA: 700.31 C709.2 R715.1 | length 46.4
  Top Layer w0.254: v1(53.904,77.443) 700.31@55.404,77.443 ; C709.2@69.154,51.943 v1(70.154,51.943) R715.1@71.154,51.943
  Bottom Layer w0.254: v1(53.904,77.443) 58.947,77.443 71.654,64.736 71.654,50.443 70.904,49.693 69.654,49.693 69.154,50.193 69.154,51.693 69.404,51.943 v1(70.154,51.943)
SIM.DET: 700.34 R714.1 R716.1 | length 29.7
  Top Layer w0.254: v1(53.904,74.443) 700.34@55.404,74.443 ; R714.1@68.154,55.693 R716.1@68.154,56.943 v1(68.154,57.943)
  Bottom Layer w0.254: v1(53.904,74.443) 58.904,74.443 68.904,64.443 68.904,58.693 v1(68.154,57.943)
SIM.RST: 700.33 C707.2 R712.1 | length 35.4
  Top Layer w0.254: v1(53.904,75.443) 700.33@55.404,75.443 ; C707.2@69.154,53.193 v1(70.154,53.193) R712.1@71.154,53.193
  Bottom Layer w0.254: v1(53.904,75.443) 58.904,75.443 70.154,64.193 v1(70.154,53.193)
SIM.VDD: 700.30 C706.2 H700.1 U701.4 | length 55.7
  Top Layer w0.35: H700.1@73.904,55.713 77.424,55.713 78.654,56.943 78.654,62.943 80.054,64.343 U701.4@81.854,64.343
  Top Layer w0.5: v1(53.904,78.443) 700.30@55.404,78.443 ; C706.2@69.154,54.443 71.427,54.443 72.697,55.713 H700.1@73.904,55.713
  Bottom Layer w0.5: v1(53.904,78.443) 59.654,78.443 72.654,65.443 v1(72.654,55.678)
SOLAR_TOP: D904.1 R900.2 RV900.2 RV900.3 T902.1 | length 37.6
  Top Layer w0.5: RV900.3@23.444,26.943 R900.2@26.654,26.943
  Top Layer w1: T902.1@8.924,30.946 11.901,30.946 15.154,27.693 15.154,25.693 17.154,23.693 19.904,23.693 20.904,24.693 RV900.2@20.904,26.943
  Top Layer w1.5: v3(15.404,38.943) D904.1@15.404,41.143 ; RV900.2@20.904,26.943 RV900.3@23.444,26.943
  Bottom Layer w1.5: T902.1@8.924,30.946 9.174,30.946 15.404,37.176 v3(15.404,38.943)
UART2.RX: 700.10 R702.1 U700.2 | length 52.1
  Top Layer w0.254: U700.2@49.429,78.393 49.429,79.368 v1(50.154,80.093) R702.1@50.154,80.693 ; 700.10@66.404,94.443 66.404,96.802 66.804,97.201 v1(66.804,97.268)
  Bottom Layer w0.254: v1(50.154,80.093) 50.154,79.668 48.954,78.468 45.829,78.468 43.329,80.968 43.329,93.713 46.309,96.693 66.229,96.693 v1(66.804,97.268)
UART2.TX: 700.9 R701.1 U700.3 | length 48.1
  Top Layer w0.254: U700.3@48.779,78.393 v1(48.779,79.518) 49.154,79.893 R701.1@49.154,80.693 ; 700.9@67.404,94.443 67.404,96.477 67.591,96.663 v1(67.591,96.73)
  Bottom Layer w0.254: v1(48.779,79.518) 48.279,79.018 46.254,79.018 43.879,81.393 43.879,93.485 46.537,96.143 67.004,96.143 v1(67.591,96.73)
USB.BOOT: 700.6 R700.2 | length 5.5
  Top Layer w0.254: R700.2@68.404,98.443 68.404,96.343 68.904,95.843 70.054,95.843 70.404,95.493 700.6@70.404,94.443
USB.DN: 700.28 P700.2 | length 13.6
  Top Layer w0.254: P700.2@46.904,86.693 47.854,87.643 49.904,87.643 51.704,85.843 51.704,82.943 54.204,80.443 700.28@55.404,80.443
USB.DP: 700.27 P700.3 | length 13.5
  Top Layer w0.254: P700.3@46.904,89.233 47.894,88.243 50.204,88.243 52.304,86.143 52.304,83.143 54.004,81.443 700.27@55.404,81.443
USB.VBUS: 700.24 C701.1 P700.1 | length 9.5
  Top Layer w0.5: P700.1@46.904,84.153 46.944,84.193 C701.1@49.654,84.193 v1(49.654,84.943) ; v1(53.604,84.443) 700.24@55.404,84.443
  Bottom Layer w0.5: v1(49.654,84.943) 50.154,84.443 v1(53.604,84.443)
V_BAT: D903.1 P800.1 R802.2 T800.2 | length 6.6
  Top Layer w0.5: P800.1@3.629,57.858 3.654,57.883 R802.2@3.654,64.443
V_SOLAR: C802.1 D800.1 D900.2 D901.1 D902.2 D904.2 D905.2 D906.2 R800.2 | length 48.6
  Top Layer w0.5: D906.2@21.404,45.743 21.404,45.543 22.154,44.793 22.354,44.793 22.454,44.693 24.454,44.693 25.204,43.943 25.204,30.443 26.704,28.943 31.204,28.943 31.654,28.493 31.654,26.993 R800.2@31.654,26.943
  Top Layer w1.5: D900.2@9.404,45.743 D902.2@12.404,45.743 D904.2@15.404,45.743 D905.2@18.404,45.743 D906.2@21.404,45.743 D901.1@21.404,48.514 ; C802.1@13.704,49.443 13.729,49.418 19.629,49.418 19.654,49.393 D901.1@20.525,49.393
V_SYSTEM: D901.2 D903.2 F200.1
VBAT: BT400.1 R402.1 | length 17.8
  Top Layer w0.5: v1(72.904,29.743) R402.1@72.904,30.693
  Bottom Layer w0.5: v1(72.904,29.743) 75.204,27.443 84.979,27.443 BT400.1@87.179,29.643 BT400.1@87.929,29.643
VIN: F200.2 L200.1 R603.1 U601.3 U601.5 | length 36.7
  Bottom Layer w1.5: v3(8.904,75.443) v3(8.904,73.693) 8.904,71.693 10.154,70.443 v3(13.904,70.443) v3(15.654,70.443) v3(17.404,70.443) 17.404,64.943 19.154,63.193 v3(31.904,63.193) v3(33.654,63.193) v3(35.154,63.193)
VOUT: C202.2 C203.1 L201.2 L202.1 L203.1 L700.1 R202.2 | length 59.9
  Top Layer w0.254: R202.2@37.654,56.943 v1(38.654,56.943)
  Top Layer w0.6: L203.1@27.404,32.918 L202.1@29.154,32.918
  Top Layer w0.9: v3(50.929,64.07) L700.1@50.929,65.443
  Bottom Layer w0.5: v1(38.654,56.943) 45.654,56.943
  Bottom Layer w1.5: v1(26.654,33.943) v1(27.904,33.943) 40.404,33.943 42.154,35.693 v3(42.154,38.443) v3(43.404,38.443) 45.654,40.693 45.654,56.943 45.654,58.193 50.404,62.943 50.404,64.143
  other v1: 29.154,33.943
pads on no net: 700.5 700.7 700.8 700.11 700.12 700.13 700.14 700.19 700.20 700.21 700.22 700.23 700.25 700.26 700.35 700.36 700.37 700.38 700.40 700.41 700.42 700.43 700.44 700.47 700.48 700.49 700.50 700.51 700.52 700.53 700.67 700.68 700.90 700.93 700.95 700.96 700.97 700.98 700.99 700.100 700.101 700.102 700.103 700.104 700.105 700.106 700.107 700.108 700.109 700.110 700.111 700.112 700.113 700.114 700.115 700.116 700.117 700.118 700.119 700.120 700.121 700.122 700.123 700.124 BT400. H700.6 MD500.7 MD500.13 MD500.14 MD500.15 MD500.16 MD500.17 MD500.18 MD500.19 MD500.20 MD500.21 MD500.22 MD500.23 MD500.24 MD500.25 MD500.26 MD500.27 P100.1 P100.2 Q700.1@64.654,67.709 Q701.1@58.654,67.709 T500.1@23.42,16.143 T601.1@43.788,100.868 T700.1@66.42,99.943 T701.1@72.42,99.943 T801.1@12.254,54.209 U400.0 U400.2 U400.40 U700.7 U700.8 U700.9 U700.11 U700.12 U700.13 U701.0 Y401.2 Y401.3

## Polygon pours and split planes (outlines as drawn)
GSM.GND on Top Layer "GSM.GND_L01_P000" (solid, remove dead copper, pour order 5): 88.804,47.843 66.304,47.843 66.304,63.443 51.804,63.443 51.804,68.243 43.204,68.243 43.204,93.743 53.804,93.743 53.804,96.943 59.004,96.943 59.004,109.843 88.804,109.843 88.804,98.343
GND on Top Layer "GND_L02_P003" (solid, remove dead copper, pour order 8): 88.804,47.843 88.804,-0.057 -0.096,-0.057 -0.096,109.943 55.404,109.943 55.404,93.713 43.329,93.713 43.329,68.243 51.804,68.243 51.804,63.443 66.304,63.443 66.304,47.843
GSM.GND on Bottom Layer "GSM.GND_L02_P001" (solid, remove dead copper, pour order 6): 88.804,47.843 88.804,109.843 59.004,109.843 59.004,96.943 53.804,96.943 53.804,93.713 43.329,93.713 43.329,68.243 51.804,68.243 51.804,63.443 66.304,63.443 66.304,47.843
GND on Bottom Layer "GND_L02_P003" (solid, remove dead copper, pour order 7): 88.804,47.843 88.804,-0.057 -0.096,-0.057 -0.096,109.943 55.404,109.943 55.404,93.713 43.329,93.713 43.329,68.243 51.804,68.243 51.804,63.443 66.304,63.443 66.304,47.843

## Keep-outs
Keep-Out Layer:
  circle w0.254: c55,55 r55

## Other copper
Top Layer:
  region net GPS_PWR: 21.804,16.043 21.904,16.143 21.904,18.743 22.204,19.043 22.804,19.043 22.904,19.143 22.904,21.443 22.804,21.543 20.704,21.543 20.304,21.143 20.304,17.643 20.004,17.343 18.804,17.343 18.604,17.143 18.604,16.243 18.804,16.043
  region net V_SOLAR: 22.404,44.443 22.654,44.693 22.654,50.443 22.404,50.693 13.154,50.693 12.779,50.318 12.779,47.818 12.154,47.193 8.404,47.193 8.154,46.943 8.154,44.693 8.404,44.443
  region net V_BAT: 2.404,62.693 1.904,62.193 1.904,55.943 2.404,55.443 14.404,55.443 14.654,55.693 14.654,62.443 14.404,62.693
  region net V_SYSTEM: 30.404,55.693 24.404,55.693 22.654,53.943 22.654,52.943 22.404,52.693 20.404,52.693 20.154,52.943 20.154,55.193 20.404,55.443 21.654,56.693 21.654,57.693 22.404,58.443 30.404,58.443 30.654,58.193 30.654,55.943
  region net V_BAT: 25.904,64.443 25.404,64.943 7.904,64.943 5.404,62.443 6.904,60.943 13.904,60.943 15.654,62.693 22.154,62.693 22.404,62.443 22.404,60.693 22.654,60.443 25.654,60.443 25.904,60.693
  region net NetD800_2: 18.654,62.193 20.654,62.193 21.154,61.693 21.154,57.743 20.954,57.543 19.829,57.543 19.529,57.843 19.529,59.768 19.154,60.143 16.879,60.143 16.504,60.518 16.504,62.093 16.629,62.218
  region net GPS_VCC: 19.229,14.018 18.804,14.443 18.804,15.518 18.954,15.668 29.179,15.668 30.004,14.843 32.229,14.843 32.354,14.718 32.354,14.093 32.279,14.018
  region net 3.3V: 39.429,24.618 39.504,24.543 41.579,24.543 41.929,24.893 41.929,35.418 41.804,35.543 39.554,35.543 39.429,35.418
  region net VOUT: 27.629,32.468 26.179,32.468 26.104,32.543 26.104,34.343 26.279,34.518 29.404,34.518 29.604,34.318 29.604,32.518 29.529,32.443
  region net 3.3V: 49.904,71.443 50.004,71.343 51.604,71.343 52.004,71.743 52.004,72.743 50.704,72.743 50.204,73.243 49.904,73.243
  region net 1.8V: 51.904,79.143 52.104,78.943 52.104,78.243 52.004,78.143 50.504,78.143 50.404,78.043 50.404,77.743 50.304,77.643 49.904,77.643 49.904,79.143
  region net GSM.PWR: 62.804,66.243 62.604,66.043 61.104,66.043 61.004,65.943 61.004,64.343 61.404,63.943 64.054,63.943 64.204,64.093 64.204,66.143 64.104,66.243
  region net 3.3V: 54.954,35.043 54.729,34.818 54.729,33.168 54.929,32.968 57.229,32.968 57.504,33.243 59.054,34.793 59.829,34.793 59.879,34.843 59.879,34.993 59.829,35.043
  region net 3.3V: 60.829,45.193 60.654,45.368 58.454,45.368 58.104,45.018 58.104,42.943 58.954,42.093 60.154,42.093 60.579,41.668 60.579,41.243 60.629,41.193 60.779,41.193 60.829,41.243
  region net GND: 61.079,45.243 61.154,45.318 62.229,45.318 62.354,45.193 62.354,43.393 62.204,43.243 61.654,43.243 61.329,42.918 61.329,41.318 61.229,41.218 61.179,41.218 61.079,41.318
  region net 3.3V: 58.104,42.943 58.104,42.743 58.404,42.443 58.904,42.443
  region net 3.3V: 58.954,42.093 54.154,42.093 54.104,42.143 54.104,42.718 54.304,42.518 58.529,42.518
  region net GND: 53.004,35.293 52.804,35.493 52.804,36.293 53.004,36.493 57.654,36.493 58.004,36.143 58.004,35.768 58.229,35.543 59.904,35.543 59.929,35.518 59.704,35.293 59.579,35.293
  region net GND: 10.854,67.593 11.054,67.393 11.454,67.793 11.454,71.568 11.354,71.668 10.954,71.668 10.854,71.568
  region net GSM.GND: 44.029,79.868 44.204,80.043 44.404,79.843 44.404,76.593 44.329,76.518 44.079,76.768 44.029,76.768
  region net GSM.GND: 49.254,74.468 49.604,74.818 49.604,71.743 49.579,71.718 49.304,71.718 49.254,71.768
  region net LED_VCC: 14.979,81.243 14.229,80.493 14.229,73.818 14.304,73.743 17.754,73.743 18.029,74.018 18.029,78.743 19.529,80.243 25.829,80.243 25.904,80.318 25.904,81.193 25.854,81.243
  region net LED_VCC: 17.754,72.818 18.029,73.093 18.029,74.018 17.604,74.443 11.804,74.443 11.729,74.368 11.729,72.893 11.804,72.818
  region net LED_VCC: 13.504,74.218 14.504,75.218 15.104,75.218 15.104,74.043 14.704,73.643
  region net VIN: 11.804,67.418 12.004,67.218 17.604,67.218 17.979,67.593 17.979,71.468 17.879,71.568 11.804,71.568
  region net VIN: 8.404,72.743 8.104,73.043 8.104,76.143 8.404,76.443 10.404,76.443 10.604,76.243 10.604,72.943 10.404,72.743
  region net VIN: 27.004,60.443 36.104,60.443 36.704,61.043 36.704,64.143 36.404,64.443 26.904,64.443 26.704,64.243 26.704,60.743
  region net LED_VCC: 23.254,96.018 20.429,96.018 17.804,93.393 17.804,91.393 18.254,90.943 25.529,90.943 26.229,91.643 26.229,95.818 26.004,96.043
  region net NetD600_1: 28.254,82.968 29.129,83.843 29.129,88.293 32.129,91.293 32.129,95.968 32.304,96.143 36.254,96.143 36.679,95.718 36.679,91.993 37.029,91.643 40.879,91.643 41.004,91.518 41.004,77.718 40.454,77.168 29.654,77.168 29.129,77.693 29.129,81.018 28.229,81.918 22.304,81.918 22.204,82.018 22.204,82.843 22.329,82.968
  region net LED_PWR: 38.604,99.543 39.104,100.043 41.004,100.043 41.304,99.743 41.304,96.943 41.804,96.443 48.004,96.443 48.804,97.243 48.804,99.043 49.104,99.343 51.904,99.343 51.904,94.343 51.304,93.743 38.604,93.743
  region net LED_PWR: 47.304,97.143 46.304,96.143 46.904,95.543 50.704,95.543 51.904,96.743 51.904,100.743 51.504,101.143 49.479,101.143 48.479,102.143 47.304,102.143
  region net NetP600_1: 53.804,104.143 54.704,105.043 54.704,108.743 55.304,109.343 59.004,109.343 59.504,108.843 59.504,105.443 60.904,104.043 60.904,96.943 60.804,96.843 53.904,96.843 53.804,96.943
  region net GSM.GND: 58.9,64.943 54.542,64.943 54.542,65.843 58.9,65.843
  pour cut-out: 58.408,68.447 53.6,68.447 53.6,66.939 58.408,66.939
  pour cut-out: 64.408,68.447 60.608,68.447 60.608,65.88 64.408,65.88
  pour cut-out: 64.9,67.447 64.463,67.447 64.463,65.88 64.9,65.88
  pour cut-out: 51.904,66.172 53.766,66.172 53.766,65.88 51.904,65.88
  pour cut-out: 60.38,96.584 52.272,96.584 52.163,96.693
  pour cut-out: 16.168,56.23 16.168,50.952 20.305,50.952 20.305,56.329 16.267,56.329
  pour cut-out: 14.208,52.439 14.208,52.693 16.154,52.693 16.154,52.439
  pour cut-out: 22.658,42.597 6.966,42.597 6.966,39.403 22.658,39.403 22.658,42.156
  pour cut-out: 39.17,32.932 25.718,32.932 25.718,30.508 39.17,30.508
  pour cut-out: 29.503,34.757 25.718,34.757 25.718,32.932 29.863,32.932
  pour cut-out: 30.428,21.597 22.147,21.597 22.147,15.102 30.428,15.102
  pour cut-out: 38.808,11.447 36.708,11.447 36.708,8.439 38.808,8.439
  pour cut-out: 32.208,75.997 32.208,76.155 24.228,76.155 24.228,75.943 24.654,75.943
  pour cut-out: 22.418,75.957 22.418,81.659 29.345,81.659 29.345,75.957 23.67,75.957
  pour cut-out: 20.9,84.243 20.9,81.443 26.093,81.443 26.093,84.243
  pour cut-out: 18.288,73.093 18.288,66.693 11.55,66.693 11.55,73.093
  pour cut-out: 13.622,74.702 7.958,74.702 7.958,71.307 11.55,71.307 11.55,71.809
  region net GND: 11.545,71.307 11.545,71.668 10.758,71.668 10.758,71.307
  pour cut-out: 6.708,72.347 4.35,72.347 4.35,71.239 6.708,71.239
  pour cut-out: 9.65,70.279 5.529,70.279 5.529,71.347 7.958,71.347
  pour cut-out: 23.904,99.943 23.904,89.193 34.404,89.193 34.404,99.943
  pour cut-out: 26.093,84.897 20.9,84.897 20.9,81.502
  pour cut-out: 52.625,40.306 52.625,43.008 56.39,43.008 56.39,40.806
  pour cut-out: 61.156,45.389 62.404,45.389 62.404,46.193 61.156,46.193
  pour cut-out: 78.533,44.922 78.533,37.464 74.708,37.464 74.708,44.922
  pour cut-out: 74.708,36.072 83.183,36.072 83.183,30.464 74.708,30.464
  pour cut-out: 21.39,74.994 21.39,79.984 22.418,79.984 22.418,74.994
  pour cut-out: 12.5,52.439 12.5,62.307 19.27,62.307 19.27,52.439
  pour cut-out: 6.55,53.093 6.55,55.193 12.654,55.193 12.654,53.628 7.154,53.628 7.154,53.697
  pour cut-out: 50.811,73.502 50.811,72.943 49.654,72.943 49.654,73.502
  region net NetC200_1: 34.104,50.043 35.004,49.143 35.004,44.243 35.204,44.043 38.104,44.043 38.204,44.143 38.204,50.843 37.004,52.043 34.104,52.043
  region net VOUT: 40.604,49.243 40.804,49.443 44.304,49.443 44.504,49.243 44.504,37.843 44.404,37.743 40.704,37.743 40.604,37.843
  region net NetC204_1: 44.879,53.068 44.954,52.993 44.954,50.743 44.929,50.718 44.279,50.718 44.204,50.793 44.204,52.068 43.954,52.318 41.579,52.318 41.529,52.368 41.529,53.043 41.554,53.068
  region net NetC204_1: 31.604,55.393 31.154,54.943 27.654,54.943 27.404,54.693 27.404,51.643 27.604,51.443 31.404,51.443 33.204,53.243 33.204,56.043 35.204,58.043 35.204,59.543 35.104,59.643 31.704,59.643 31.604,59.543
  pour cut-out: 41.303,55.856 41.303,51.961 43.945,51.961 43.945,55.856
  pour cut-out: 36.1,58.747 36.1,56.389 38.208,56.389 38.208,57.497 37.208,57.497 37.208,58.747
  pour cut-out: 23.904,90.684 12.404,90.684 12.404,99.943 23.904,99.943
  region net GSM.PWR: 61.404,63.943 59.454,63.943 59.354,64.043 59.354,64.918 59.479,65.043 60.904,65.043 61.004,65.143
  pour cut-out: 35.104,50.043 35.104,43.343 43.804,43.343 43.804,50.043
  region net GSM.GND: 54.542,64.943 54.542,64.805 55.404,63.943 58.654,63.943 58.904,64.193 58.9,64.197 58.9,64.943
  region net GSM.GND: 56.404,67.043 56.504,66.943 56.504,66.368 56.679,66.193 58.846,66.193 58.904,66.135 58.904,64.193 58.654,63.943 55.404,63.943 54.542,64.805 54.542,65.831 54.754,66.043 54.754,66.918 54.879,67.043
  region net 3.3V: 57.704,42.643 58.204,43.143 58.604,43.143 58.604,42.343 58.504,42.243
  region net NetC204_1: 34.704,57.643 34.704,54.743 33.004,53.043 32.404,53.643 32.404,57.143
  region net NetC204_1: 32.704,53.543 34.604,53.543 34.704,53.643 34.704,55.543
  pour cut-out: 37.504,52.143 34.704,52.143 34.704,56.389 37.504,56.389
  pour cut-out: 31.104,62.443 31.104,57.493 35.554,57.493 35.554,62.443
  pour cut-out: 30.904,55.434 30.904,65.043 20.959,65.043 20.959,55.434
  pour cut-out: 37.208,59.747 37.208,65.043 30.904,65.043 30.904,59.747
  pour cut-out: 27.865,53.942 27.865,60.184 30.904,60.184 30.904,53.942
  pour cut-out: 20.646,34.715 20.646,31.747 24.69,31.747 24.69,34.715
  pour cut-out: 16.454,34.715 13.104,34.715 13.104,33.607 16.454,33.607
  pour cut-out: 4.1,67.497 4.1,64.997 5.737,64.997 5.737,67.497
  pour cut-out: 48.868,103.797 48.868,97.193 53.545,97.193 53.545,103.797
  pour cut-out: 45.361,96.702 47.045,96.702 47.045,97.25 45.361,97.25
  pour cut-out: 72.9,21.897 72.9,19.531 79.818,19.531 79.818,24.497 72.919,24.497
  pour cut-out: 67.85,97.889 64.904,97.889 64.904,95.252 68.016,95.252 68.016,97.183
  pour cut-out: 64.65,97.989 64.65,96.093 65.016,96.093 65.016,97.989
  pour cut-out: 66.158,97.989 68.016,97.989 68.016,97.693 66.154,97.693
  pour cut-out: 71.85,101.897 72.958,101.897 72.958,104.747 71.85,104.747
  pour cut-out: 67.158,101.897 67.158,104.747 65.85,104.747 65.85,101.897 66.918,101.897
  pour cut-out: 81.004,65.043 81.004,62.343 84.804,62.343 84.804,65.043
  region net GSM.GND: 86.429,63.893 86.429,63.493 83.379,63.493 83.379,63.893
  region net GSM.VBAT: 81.879,79.743 82.529,79.093 82.529,75.643 82.979,75.193 85.979,75.193 86.154,75.018 86.154,72.718 86.054,72.618 80.929,72.618 80.804,72.743 80.804,76.843 80.504,77.143 78.779,77.143 78.604,77.318 78.604,79.568 78.779,79.743
  pour cut-out: 83.154,89.193 83.154,85.443 86.654,85.443 86.654,89.193
  pour cut-out: 88.804,98.343 88.804,7.243 110.004,7.243 110.004,98.343
  pour cut-out: 66.304,61.843 66.304,54.957 69.708,54.957 69.708,61.843
  pour cut-out: 68.6,56.15 68.6,50.139 77.961,50.139 77.961,56.15
  pour cut-out: 74.754,65.447 74.458,65.743 74.304,65.743 69.787,61.226 69.787,60.982 69.828,60.94 70.247,60.94
  pour cut-out: 74.393,67.454 74.404,67.443 70.092,63.131 62.515,63.131 62.128,63.518 62.128,63.684 62.266,63.684 66.036,67.454
  pour cut-out: 43.204,73.447 43.204,68.243 51.804,68.243 51.804,73.002 50.811,73.002 50.811,73.447
  pour cut-out: 45.6,82.247 45.6,79.347 46.023,79.347 46.023,82.247
  pour cut-out: 84.35,84.339 84.35,77.943 85.458,77.943 85.458,84.339
  pour cut-out: 88.804,78.082 85.458,78.082 85.458,76.804 88.804,76.804
  region net 3.3V: 66.079,32.418 66.154,32.343 69.829,32.343 70.104,32.068 70.104,31.368 70.179,31.293 70.604,31.293 70.729,31.418 70.729,33.093 70.379,33.443 66.429,33.443 66.329,33.543 66.329,34.043 66.279,34.093 66.104,34.093 66.079,34.068 66.079,33.668
  pour cut-out: 74.708,31.139 72.042,31.139 72.042,33.128 74.708,33.128
  pour cut-out: 68.6,31.455 68.6,31.034 71.1,31.034 71.1,31.455
  pour cut-out: 74.708,42.497 72.708,42.497 72.708,41.669 74.708,41.669
  region net GND: 42.904,71.443 44.154,71.443 44.154,67.693 42.654,67.693 42.654,67.943
  pour cut-out: 48.277,64.333 48.277,63.081 54.154,63.081 54.154,64.333
  pour cut-out: 32.8,6.589 32.8,11.129 36.708,11.129 36.708,6.589 35.008,6.589
  pour cut-out: 10.3,53.628 10.3,53.439 12.5,53.439 12.5,53.628
  pour cut-out: 43.159,96.702 43.159,99.739 44.358,99.739 44.358,96.702
  pour cut-out: 45.558,103.647 45.558,101.939 48.868,101.939 48.868,103.647
  pour cut-out: 48.868,103.797 44.05,103.797 44.05,101.939 48.868,101.939
  pour cut-out: 78.904,94.018 77.279,94.018 77.279,88.831 78.904,88.831
  pour cut-out: 83.35,82.997 78.339,82.997 78.339,81.889 83.35,81.889
  pour cut-out: 80.929,72.359 80.248,72.359 80.248,73.133 80.929,73.133
  pour cut-out: 42.945,73.447 42.945,71.443 43.204,71.443 43.204,73.188
  pour cut-out: 32.504,50.384 33.85,50.384 33.85,53.247 32.504,53.247
  region net NetC200_1: 33.004,52.043 32.154,51.193 32.154,46.943 32.404,46.693 34.654,46.693 35.154,46.193 35.654,46.693 35.654,51.943 35.554,52.043
  pour cut-out: 85.615,76.815 cw(c85.458,77.912) 84.35,77.912 84.35,78.115
Bottom Layer:
  region net VOUT: 50.904,65.943 49.804,65.943 49.604,65.743 49.604,62.343 50.154,62.343 51.454,63.643
  region net VOUT: 51.454,63.643 51.454,65.593 51.104,65.943 50.904,65.943
  region net VOUT: 51.454,63.643 51.454,62.993 50.304,61.843 50.104,62.043 50.104,64.843
  pour cut-out: 68.795,51.842 67.592,51.842 67.592,64.032 70.516,64.032 70.516,52.46
  pour cut-out: 54.654,72.693 56.154,72.693 67.792,63.318 69.054,64.032 58.904,74.443 54.654,74.443
  pour cut-out: 60.394,63.473 60.394,67.443 63.945,67.443 63.945,63.443
  region net GND: 43.329,71.443 44.104,71.443 44.104,67.343 43.329,67.343
  region net GND: 44.29,68.243 44.29,71.443 42.904,71.443 42.904,68.243
  region net GND: 43.329,73.044 44.29,72.083 44.29,71.443 42.404,71.443 41.404,72.443

## Silkscreen, mask and mechanical layers (free items; w line width, h text height)
Top Overlay:
  text "LED-" at 41.579,105.718 h3.2
  text "LED+" at 60.079,105.718 h3.2
  text "12V" at 28.105,63.587 h2.5 r90
  text "24V" at 32.681,63.587 h2.5 r90
  text "BAT+" at 1.754,60.893 h2
  text "LED CTRL" at 65.86,49.03 h2 r90
  text "BAT-" at 1.754,48.068 h2
  text "ĐT: 02253759598 - 0913538298" at 99.279,33.635 h3.3 r90
  text "TOP" at 11.404,29.943 h2
  text "CTY CP THIẾT BỊ BÁO HIỆU HÀNG HẢI MIỀN BẮC" at 91.954,20.128 h3.3 r90
  text "Số 2A/215, Lê Lai, Phường Ngô Quyền, TP Hải Phòng" at 95.345,18.781 h3.2 r90

## Text inside footprints (layer, text, board x,y; h text height)
C503: Top Overlay "+" at 38.396,7.793 h2 r180
P100: Top Overlay "8" at 78.612,27.067 h1.27 r90; Top Overlay "7" at 81.152,27.067 h1.27 r90; Top Overlay "1" at 81.152,15.891 h1.27 r90; Top Overlay "2" at 78.612,15.383 h1.27 r90